# Altium PCB Copy before routing of BetaBake..PcbDoc (part 2 of 4)
Units mil, origin at the board's own origin, x right, y up, seen from the top; angles counter-clockwise.
Board outline 6000 x 4000 mil, 8 copper layers (Top Layer, GND Plein, Signal 2, PWR, GND Plein 2, Signal 3, GND Plein 3, Bottom Layer), stack 40.468 mil thick; 436 components, 343 nets, 1746 pads, 14 vias.
Unrouted connection lines stored in the file: 1158.
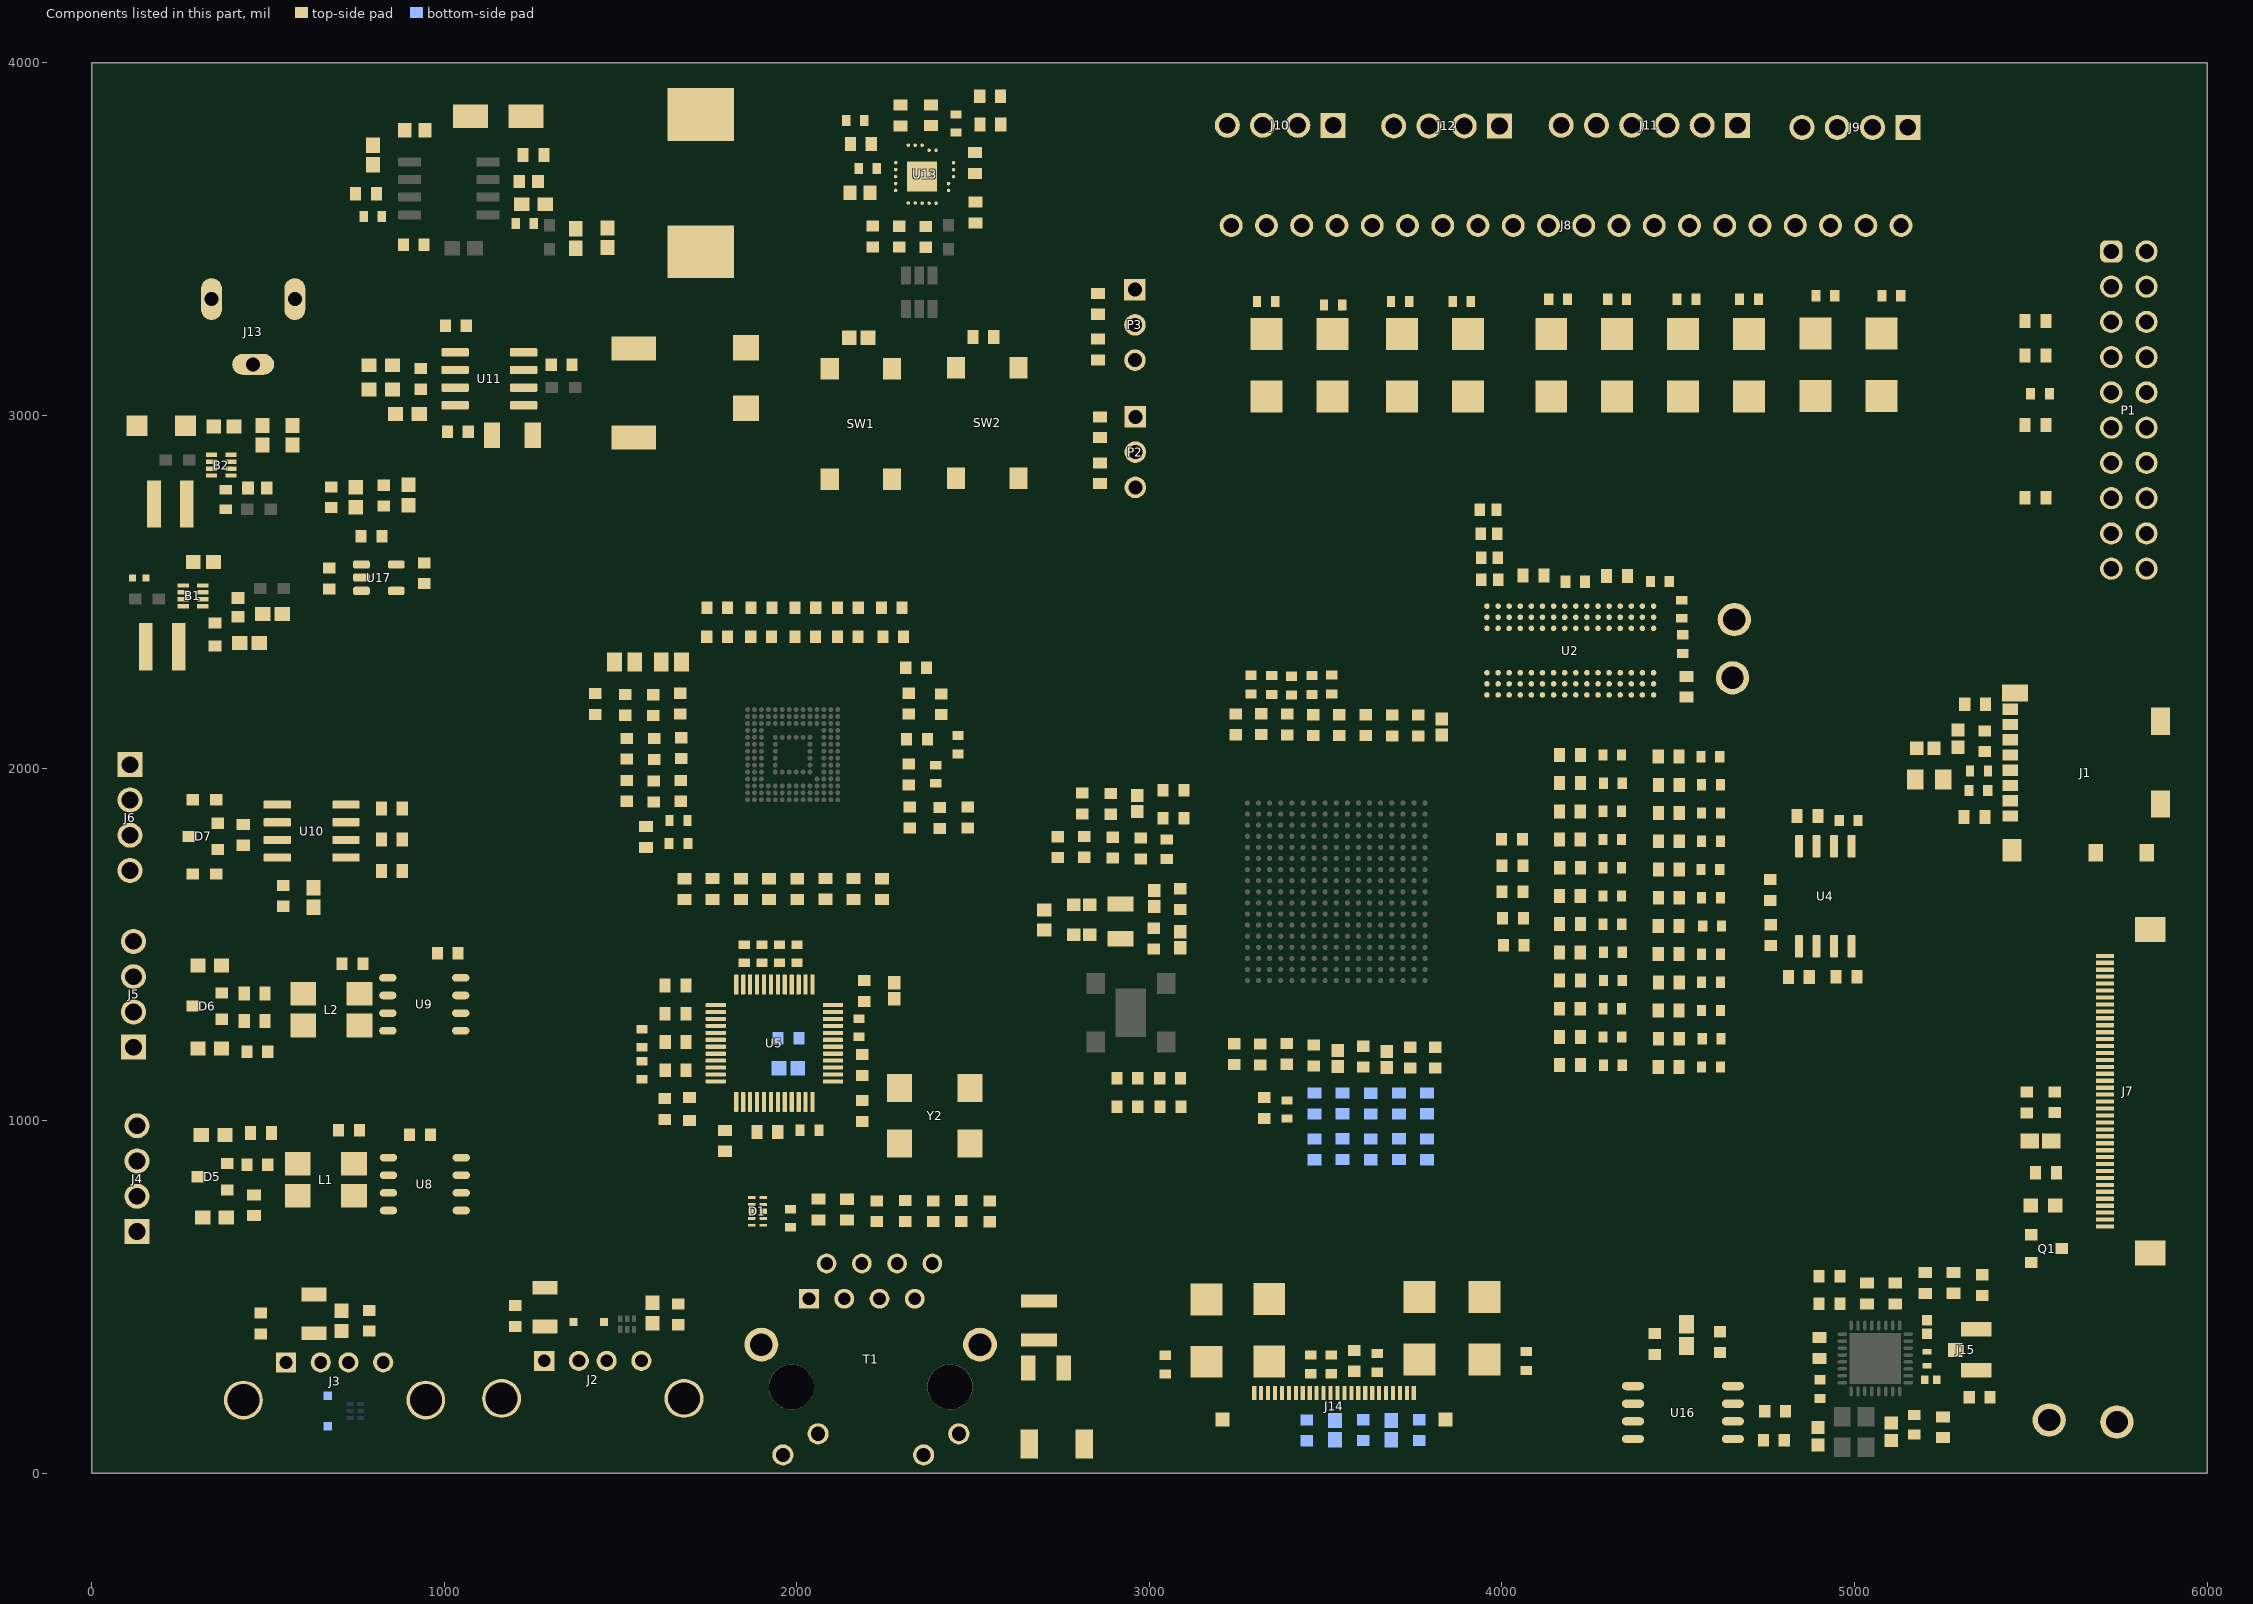
[diagram p4: the components of this part, seen from the top]

## Footprints (in the part's own frame and the unit in brackets; to place one, negate y for a bottom-side part, rotate by r counter-clockwise, add the part's x,y. Pads: shape width x height; smd on the part's side, far side on the other; paste and mask are expansions set on the pad) (continued)
FP-RGP0020A-MFG [mm]
  round 0.252 smd paste-1000 mask+0: 1(-1.9,1) 2(-1.9,0.5) 3(-2.26,0) 4(-2.26,-0.5) 5(-2.26,-1) 6(-1,-1.9) 7(-0.5,-1.9) 8(0,-2.26) 9(0.5,-2.26) 10(1,-2.26) 11(1.9,-1) 12(1.9,-0.5) 13(1.915,0) 14(1.915,0.5) 15(1.915,1) 16(1,1.9) 17(0.5,1.9) 18(0,1.915) 19(-0.5,1.915) 20(-1,1.915)
  rect 2.15x2.15 smd paste-1000 mask+0: 21(0,0)
  Top Layer region: -2.4,1.14 -1.54,1.14 -1.486,1.129 -1.441,1.099 -1.411,1.054 -1.4,1 -1.4,1 -1.411,0.946 -1.441,0.901 -1.486,0.871 -1.54,0.86 -1.54,0.86 -2.4,0.86
  Top Layer region: -2.4,0.64 -1.54,0.64 -1.486,0.629 -1.441,0.599 -1.411,0.554 -1.4,0.5 -1.4,0.5 -1.411,0.446 -1.441,0.401 -1.486,0.371 -1.54,0.36 -1.54,0.36 -2.4,0.36
  Top Layer region: -2.4,0.14 -1.54,0.14 -1.486,0.129 -1.441,0.099 -1.411,0.054 -1.4,0 -1.4,0 -1.411,-0.054 -1.441,-0.099 -1.486,-0.129 -1.54,-0.14 -1.54,-0.14 -2.4,-0.14
  Top Layer region: -2.4,-0.36 -1.54,-0.36 -1.486,-0.371 -1.441,-0.401 -1.411,-0.446 -1.4,-0.5 -1.4,-0.5 -1.411,-0.554 -1.441,-0.599 -1.486,-0.629 -1.54,-0.64 -1.54,-0.64 -2.4,-0.64
  Top Layer region: -2.4,-0.86 -1.54,-0.86 -1.486,-0.871 -1.441,-0.901 -1.411,-0.946 -1.4,-1 -1.4,-1 -1.411,-1.054 -1.441,-1.099 -1.486,-1.129 -1.54,-1.14 -1.54,-1.14 -2.4,-1.14
  Top Layer region: 2.4,0.86 1.54,0.86 1.486,0.871 1.441,0.901 1.411,0.946 1.4,1 1.4,1 1.411,1.054 1.441,1.099 1.486,1.129 1.54,1.14 1.54,1.14 2.4,1.14
  Top Layer region: -0.64,-2.4 -0.64,-1.54 -0.629,-1.486 -0.599,-1.441 -0.554,-1.411 -0.5,-1.4 -0.5,-1.4 -0.446,-1.411 -0.401,-1.441 -0.371,-1.486 -0.36,-1.54 -0.36,-1.54 -0.36,-2.4
  Top Layer region: -0.14,-2.4 -0.14,-1.54 -0.129,-1.486 -0.099,-1.441 -0.054,-1.411 0,-1.4 0,-1.4 0.054,-1.411 0.099,-1.441 0.129,-1.486 0.14,-1.54 0.14,-1.54 0.14,-2.4
  Top Layer region: 0.36,-2.4 0.36,-1.54 0.371,-1.486 0.401,-1.441 0.446,-1.411 0.5,-1.4 0.5,-1.4 0.554,-1.411 0.599,-1.441 0.629,-1.486 0.64,-1.54 0.64,-1.54 0.64,-2.4
  Top Layer region: 0.86,-2.4 0.86,-1.54 0.871,-1.486 0.901,-1.441 0.946,-1.411 1,-1.4 1,-1.4 1.054,-1.411 1.099,-1.441 1.129,-1.486 1.14,-1.54 1.14,-1.54 1.14,-2.4
  Top Layer region: 1.14,2.4 1.14,1.54 1.129,1.486 1.099,1.441 1.054,1.411 1,1.4 1,1.4 0.946,1.411 0.901,1.441 0.871,1.486 0.86,1.54 0.86,1.54 0.86,2.4
  Top Layer region: 0.64,2.4 0.64,1.54 0.629,1.486 0.599,1.441 0.554,1.411 0.5,1.4 0.5,1.4 0.446,1.411 0.401,1.441 0.371,1.486 0.36,1.54 0.36,1.54 0.36,2.4
  Top Layer region: 0.14,2.4 0.14,1.54 0.129,1.486 0.099,1.441 0.054,1.411 0,1.4 0,1.4 -0.054,1.411 -0.099,1.441 -0.129,1.486 -0.14,1.54 -0.14,1.54 -0.14,2.4
  Top Layer region: -0.36,2.4 -0.36,1.54 -0.371,1.486 -0.401,1.441 -0.446,1.411 -0.5,1.4 -0.5,1.4 -0.554,1.411 -0.599,1.441 -0.629,1.486 -0.64,1.54 -0.64,1.54 -0.64,2.4
  Top Layer region: -0.86,2.4 -0.86,1.54 -0.871,1.486 -0.901,1.441 -0.946,1.411 -1,1.4 -1,1.4 -1.054,1.411 -1.099,1.441 -1.129,1.486 -1.14,1.54 -1.14,1.54 -1.14,2.4
  Top Layer region: 2.4,-1.14 1.54,-1.14 1.486,-1.129 1.441,-1.099 1.411,-1.054 1.4,-1 1.4,-1 1.411,-0.946 1.441,-0.901 1.486,-0.871 1.54,-0.86 1.54,-0.86 2.4,-0.86
  Top Layer region: 2.4,-0.64 1.54,-0.64 1.486,-0.629 1.441,-0.599 1.411,-0.554 1.4,-0.5 1.4,-0.5 1.411,-0.446 1.441,-0.401 1.486,-0.371 1.54,-0.36 1.54,-0.36 2.4,-0.36
  Top Layer region: 2.4,-0.14 1.54,-0.14 1.486,-0.129 1.441,-0.099 1.411,-0.054 1.4,0 1.4,0 1.411,0.054 1.441,0.099 1.486,0.129 1.54,0.14 1.54,0.14 2.4,0.14
  Top Layer region: -1.14,-2.4 -1.14,-1.54 -1.129,-1.486 -1.099,-1.441 -1.054,-1.411 -1,-1.4 -1,-1.4 -0.946,-1.411 -0.901,-1.441 -0.871,-1.486 -0.86,-1.54 -0.86,-1.54 -0.86,-2.4
  Top Layer region: 2.4,0.36 1.54,0.36 1.486,0.371 1.441,0.401 1.411,0.446 1.4,0.5 1.4,0.5 1.411,0.554 1.441,0.599 1.486,0.629 1.54,0.64 1.54,0.64 2.4,0.64
  silkscreen extent -3.1,-2.07 2.07,2.07, body extent -2.5,-2.5 2.5,2.5, height 0.25
FP-RT0603-MFG [mm]
  rect 0.9x0.8 smd paste+0 mask+0: 1(-0.85,0) 2(0.85,0)
  silkscreen extent -0.85,-0.81 0.86,0.8, body extent -1.4,-0.55 1.4,0.55, height 0.25
FP-SMA-MFG [mm]
  rect 2.5x1.7 smd paste+0 mask+0: 1(-2,0) 2(2,0)
  silkscreen extent -3.92,-1.46 2.3,1.46, body extent -3.35,-1.56 3.35,1.56, height 0.25
FP-SMBJ-CA-MFG [mm]
  rect 1.27x2.1 smd paste+0 mask+0: 1(-1.98,0) 2(1.98,0)
  silkscreen extent -2.28,-1.97 2.28,1.97, body extent -2.7,-1.81 2.7,1.81, height 2.44
FP-SMC-MFG [mm]
  rect 1.72x3.2 smd paste+0 mask+0: 1(-3.205,0) 2(3.205,0)
  silkscreen extent -4.75,-3.11 3.55,3.11, body extent -4.17,-3.21 4.17,3.21, height 0.25
FP-SOD323-CA-MFG [mm]
  rect 0.6x0.6 smd paste-1000 mask+0: 1(-1.1,0) 2(1.1,0)
  silkscreen extent -0.43,-0.67 0.43,0.67, body extent -1.25,-0.63 1.25,0.63, height 1.1
FP-TW-IPC_C [mm]
  round 0.399 smd paste+0 mask+0: A1(-3.2,6) A2(-2.4,6) A3(-1.6,6) A7(1.6,6) A8(2.4,6) A9(3.2,6) B1(-3.2,5.2) B2(-2.4,5.2) B3(-1.6,5.2) B7(1.6,5.2) B8(2.4,5.2) B9(3.2,5.2) C1(-3.2,4.4) C2(-2.4,4.4) C3(-1.6,4.4) C7(1.6,4.4) C8(2.4,4.4) C9(3.2,4.4) D1(-3.2,3.6) D2(-2.4,3.6) D3(-1.6,3.6) D7(1.6,3.6) D8(2.4,3.6) D9(3.2,3.6) E1(-3.2,2.8) E2(-2.4,2.8) E3(-1.6,2.8) E7(1.6,2.8) E8(2.4,2.8) E9(3.2,2.8) F1(-3.2,2) F2(-2.4,2) F3(-1.6,2) F7(1.6,2) F8(2.4,2) F9(3.2,2) G1(-3.2,1.2) G2(-2.4,1.2) G3(-1.6,1.2) G7(1.6,1.2) G8(2.4,1.2) G9(3.2,1.2) H1(-3.2,0.4) H2(-2.4,0.4) H3(-1.6,0.4) H7(1.6,0.4) H8(2.4,0.4) H9(3.2,0.4) J1(-3.2,-0.4) J2(-2.4,-0.4) J3(-1.6,-0.4) J7(1.6,-0.4) J8(2.4,-0.4) J9(3.2,-0.4) K1(-3.2,-1.2) K2(-2.4,-1.2) K3(-1.6,-1.2) K7(1.6,-1.2) K8(2.4,-1.2) K9(3.2,-1.2) L1(-3.2,-2) L2(-2.4,-2) L3(-1.6,-2) L7(1.6,-2) L8(2.4,-2) L9(3.2,-2) M1(-3.2,-2.8) M2(-2.4,-2.8) M3(-1.6,-2.8) M7(1.6,-2.8) M8(2.4,-2.8) M9(3.2,-2.8) N1(-3.2,-3.6) N2(-2.4,-3.6) N3(-1.6,-3.6) N7(1.6,-3.6) N8(2.4,-3.6) N9(3.2,-3.6) P1(-3.2,-4.4) P2(-2.4,-4.4) P3(-1.6,-4.4) P7(1.6,-4.4) P8(2.4,-4.4) P9(3.2,-4.4) R1(-3.2,-5.2) R2(-2.4,-5.2) R3(-1.6,-5.2) R7(1.6,-5.2) R8(2.4,-5.2) R9(3.2,-5.2) T1(-3.2,-6) T2(-2.4,-6) T3(-1.6,-6) T7(1.6,-6) T8(2.4,-6) T9(3.2,-6)
  silkscreen extent -4.55,-7 4,7, body extent -4.1,-7.1 4.1,7.1, height 0.25
FP-XFL4015-MFG [mm]
  rect 0.98x3.4 smd paste+0 mask+0: 1(-1.185,0) 2(1.185,0)
  silkscreen extent -2.68,-2.15 2.15,2.15, body extent -2.25,-2.25 2.25,2.25, height 0.25
J00-00XXNL [mil]
  rect 56x56 hole 36: 1(175,-250)
  round 56 hole 36: 2(125,-350) 3(75,-250) 4(25,-350) 5(-25,-250) 6(-75,-350) 7(-125,-250) 8(-175,-350)
  round 60 hole 40: 9(249,193) 10(149,133) 11(-150,193) 12(-250,133)
  round 96 hole 64: S1(-310,-120) S2(310,-120)
  round 128 hole 128 unplated: ""(-225,0) ""(225,0)
  silkscreen extent -375,-425 375,425, body extent -395,-415 392,425, height 601
KEYSTONE_5277 [mm]
  round 2.4 hole 1.6: 1(0,0)
  silkscreen extent -1.59,-1.59 1.59,1.59, body extent -1.07,-1.85 2.09,1.33, height 3.17
MOLX-54548-2471 [mm] "FPC Connector, 24-Leads, Right Angle, Pitch 0.5 mm, Mated Height 1.2 mm, SMT"
  rect 0.3x1 smd: 1(-5.75,0.95) 2(-5.25,0.95) 3(-4.75,0.95) 4(-4.25,0.95) 5(-3.75,0.95) 6(-3.25,0.95) 7(-2.75,0.95) 8(-2.25,0.95) 9(-1.75,0.95) 10(-1.25,0.95) 11(-0.75,0.95) 12(-0.25,0.95) 13(0.25,0.95) 14(0.75,0.95) 15(1.25,0.95) 16(1.75,0.95) 17(2.25,0.95) 18(2.75,0.95) 19(3.25,0.95) 20(3.75,0.95) 21(4.25,0.95) 22(4.75,0.95) 23(5.25,0.95) 24(5.75,0.95)
  rect 1x1 smd: MP1(-8.025,-0.95) MP2(8.025,-0.95)
  Top Layer region: 8.85,-0.3 7.2,-0.3 7.2,-1.6 8.85,-1.6
  Top Layer region: -8.85,-0.3 -7.2,-0.3 -7.2,-1.6 -8.85,-1.6
  silkscreen extent -8.6,-3.85 8.6,2.13, body extent -8.6,-3.85 8.6,1.15, height 1.21
NXP-SOIC-8_L [mm] "SOIC, 8-Leads, Body 5x4mm, Pitch 1.27mm, IPC High Density"
  oval 1.25x0.55 smd: 1(-2.625,1.905) 2(-2.625,0.635) 3(-2.625,-0.635) 4(-2.625,-1.905) 5(2.625,-1.905) 6(2.625,-0.635) 7(2.625,0.635) 8(2.625,1.905)
  silkscreen extent -2.75,-2.5 1.6,2.85, body extent -3,-2.5 3,2.5, height 1.75
PT0048A_N [mm] "QFP, 48-Leads, Body 7x7mm, Pitch 0.5mm, IPC Medium Density"
  rrect33% 1.45x0.3 smd: 1(-4.225,2.75) 2(-4.225,2.25) 3(-4.225,1.75) 4(-4.225,1.25) 5(-4.225,0.75) 6(-4.225,0.25) 7(-4.225,-0.25) 8(-4.225,-0.75) 9(-4.225,-1.25) 10(-4.225,-1.75) 11(-4.225,-2.25) 12(-4.225,-2.75) 25(4.225,-2.75) 26(4.225,-2.25) 27(4.225,-1.75) 28(4.225,-1.25) 29(4.225,-0.75) 30(4.225,-0.25) 31(4.225,0.25) 32(4.225,0.75) 33(4.225,1.25) 34(4.225,1.75) 35(4.225,2.25) 36(4.225,2.75)
  rrect33% 0.3x1.45 smd: 13(-2.75,-4.225) 14(-2.25,-4.225) 15(-1.75,-4.225) 16(-1.25,-4.225) 17(-0.75,-4.225) 18(-0.25,-4.225) 19(0.25,-4.225) 20(0.75,-4.225) 21(1.25,-4.225) 22(1.75,-4.225) 23(2.25,-4.225) 24(2.75,-4.225) 37(2.75,4.225) 38(2.25,4.225) 39(1.75,4.225) 40(1.25,4.225) 41(0.75,4.225) 42(0.25,4.225) 43(-0.25,4.225) 44(-0.75,4.225) 45(-1.25,4.225) 46(-1.75,4.225) 47(-2.25,4.225) 48(-2.75,4.225)
  silkscreen extent -4.35,-3.1 3.1,3.58, body extent -4.51,-4.51 4.51,4.51, height 1.5
PTS645SM43SMTR92LFS_MFG [mm] "Recommended Land Pattern"
  rect 1.55x1.3 smd paste+0 mask+0: 1(-3.975,2.25) 2(3.975,2.25) 3(-3.975,-2.25) 4(3.975,-2.25)
  silkscreen extent -5.52,-3 3,3, body extent -4.5,-3 4.5,3, height 5.3
RESC0603(1608)_L [mm] "Chip Resistor, Body 1.6x0.8mm, IPC High Density"
  rect 0.7x0.9 smd: 1(-0.7,0) 2(0.7,0)
  silkscreen extent -0.05,-0.35 0.05,0.35, body extent -0.85,-0.47 0.85,0.47, height 0.6
RESC1607X60N [mm]
  rect 1.04x1.02 smd: 1(-0.735,0) 2(0.735,0)
  body extent -0.8,-0.4 0.8,0.4, height 0.55
RESC1608X55N#1 [mm]
  rect 0.79x0.93 smd paste+0 mask+0.102: 1(-0.82,0) 2(0.82,0)
  silkscreen extent -0.11,-0.45 0.11,0.45, body extent -0.8,-0.4 0.8,0.4, height 0.55
RESC1608X55N#2 [mm]
  rect 0.79x0.93 smd: 1(-0.82,0) 2(0.82,0)
  silkscreen extent -0.11,-0.45 0.11,0.45, body extent -0.8,-0.4 0.8,0.4, height 0.55
RESC1608X55X25LL10T15 [mm] "Chip Resistor, 2-Leads, Body 1.60x0.80mm, IPC High Density"
  rect 0.6x0.8 smd: 1(-0.65,0) 2(0.65,0)
  body extent -0.85,-0.45 0.85,0.45, height 0.55
RESC1608X55X25ML10T15 [mm] "Chip Resistor, 2-Leads, Body 1.60x0.80mm, IPC Low Density"
  rect 0.8x1 smd: 1(-0.75,0) 2(0.75,0)
  body extent -0.85,-0.45 0.85,0.45, height 0.55
RESC1608X55X25NL10T15 [mm] "Chip Resistor, 2-Leads, Body 1.60x0.80mm, IPC Medium Density"
  rect 0.7x0.9 smd: 1(-0.7,0) 2(0.7,0)
  body extent -0.85,-0.45 0.85,0.45, height 0.55
RESC2013X60X35ML10T20 [mm] "Chip Resistor, 2-Leads, Body 2.1x1.35mm, IPC Low Density"
  rect 1.2x1.45 smd: 1(-1,0) 2(1,0)
  silkscreen extent -0.1,-0.63 0.1,0.63, body extent -1.05,-0.68 1.05,0.67, height 0.6
SMTC-TSW-103-07-X-S [mm] ".025 SQ Post Terminal Strip Assembly, 1x3 Pins, Vertical, 2.54mm Pitch, Male"
  rect 1.55x1.55 hole 1.02: 1(0,0)
  round 1.55 hole 1.02: 2(2.54,0) 3(5.08,0)
  silkscreen extent -1.46,-1.27 6.54,1.27, body extent -1.27,-1.27 6.35,1.27, height 8.38
SOIC127P599X175-8N [mm]
  rrect25% 1.97x0.6 smd paste+0 mask+0.102: 1(-2.47,1.905) 2(-2.47,0.635) 3(-2.47,-0.635) 4(-2.47,-1.905) 5(2.47,-1.905) 6(2.47,-0.635) 7(2.47,0.635) 8(2.47,1.905)
  silkscreen extent -4.14,-2.52 1.95,2.52, body extent -3,-2.45 3,2.45, height 1.75
SOIC127P600X175-8N [mm]
  rrect25% 1.97x0.59 smd paste+0 mask+0.102: 1(-2.475,1.905) 2(-2.475,0.635) 3(-2.475,-0.635) 4(-2.475,-1.905) 5(2.475,-1.905) 6(2.475,-0.635) 7(2.475,0.635) 8(2.475,1.905)
  silkscreen extent -4.54,-2.52 2,2.59, body extent -3,-2.49 3,2.49, height 1.68
SOIC127P790X216-8N#1 [mm]
  rrect25% 1.61x0.58 smd: 1(-3.605,1.905) 2(-3.605,0.635) 3(-3.605,-0.635) 4(-3.605,-1.905) 5(3.605,-1.905) 6(3.605,-0.635) 7(3.605,0.635) 8(3.605,1.905)
  silkscreen extent -5.31,-2.64 2.64,2.64, body extent -3.95,-2.64 3.95,2.64, height 2.16
SOIC127P790X216-8N#2 [mm]
  oval 1.6x0.6 smd: 1(-3.6,-1.905) 2(-3.6,-0.635) 3(-3.6,0.635) 4(-3.6,1.905) 5(3.6,1.905) 6(3.6,0.635) 7(3.6,-0.635) 8(3.6,-1.905)
  silkscreen extent -3.82,-2.82 2.47,2.65, body extent -3.95,-2.64 3.95,2.64
SON50P150X200X100-8N [mm]
  rect 0.8x0.3 smd: 1(-0.7,0.75) 2(-0.7,0.25) 3(-0.7,-0.25) 4(-0.7,-0.75) 5(0.7,-0.75) 6(0.7,-0.25) 7(0.7,0.25) 8(0.7,0.75)
  silkscreen extent -1.22,1.28 -0.97,1.52
SOT23-3 [mm]
  rect 0.8x0.9 smd: 1(-0.95,-1) 2(0.95,-1) 3(0,1.1)
  silkscreen extent -1.4,-0.1 1.4,0.7, body extent -1.15,-1.45 1.15,1.45, height 1.1
SOT95P280X145-5N [mm]
  rrect50% 1.21x0.59 smd paste+0 mask+0.102: 1(-1.255,0.95) 2(-1.255,0) 3(-1.255,-0.95) 4(1.255,-0.95) 5(1.255,0.95)
  silkscreen extent -2.51,-1.45 0.8,1.45, body extent -1.4,-1.45 1.4,1.45, height 1.45
SPM10054T6R8MHZR [mm]
  rect 3.8x4.8 smd: 1(-4.95,0) 2(4.95,0)
  silkscreen extent -7.4,-5 5.35,5
TE-292303-1_V [mm] "THD, 4-Leads, Body 13.13x14mm, Pitch 2.5mm"
  rect 1.45x1.45 hole 0.92: 1(-3.5,1.144)
  round 1.45 hole 0.92: 2(-1,1.144) 3(1,1.144) 4(3.5,1.144)
  round 2.8 hole 2.3: 5(-6.57,-1.566) 6(6.57,-1.566)
  silkscreen extent -6.57,-11.85 6.57,3.25, body extent -8.12,-11.85 8.12,2.15, height 7.72
TE_282834-4 [mm]
  rect 1.8x1.8 / inner round 1.8 / far side rect 1.8x1.8 hole 1.2: 1(-3.81,0)
  round 1.8 hole 1.2: 2(-1.27,0) 3(1.27,0) 4(3.81,0)
  silkscreen extent -6.16,-3.25 5.31,3.25, body extent -5.31,-3.25 5.31,3.25, height 10
TE_282834-6 [mm]
  rect 1.8x1.8 / inner round 1.8 / far side rect 1.8x1.8 hole 1.2: 1(-6.35,0)
  round 1.8 hole 1.2: 2(-3.81,0) 3(-1.27,0) 4(1.27,0) 5(3.81,0) 6(6.35,0)
  silkscreen extent -8.7,-3.25 7.85,3.25, body extent -7.85,-3.25 7.85,3.25, height 10
TE_1909763-1 [mm]
  rect 1x1.05 smd: 1(0,-1.525)
  rect 1.05x2.2 smd: G1(-1.475,0) G2(1.475,0)
  silkscreen extent -0.6,1.3 0.6,1.3, body extent -1.5,0 1.5,1.23, height 1.55
WE-PD_6033R [mm] "SMT Shielded Power Inductor, 2-leads, body 5.9x6.2mm"
  rect 1.85x1.9 smd: 1(-2.175,0) 2(2.175,0)
  Top Layer keep-out region: -2.95,-3.1 -2.95,-1.15 -1.05,-1.15 -1.05,1.15 -2.95,1.15 -2.95,3.1 2.95,3.1 2.95,1.15 1.05,1.15 1.05,-1.15 2.95,-1.15 2.95,-3.1
  silkscreen extent -3.72,-3.25 3.1,3.25, body extent -2.95,-3.1 2.95,3.1, height 2.9
WE-TVSP_DO-214AA_Bidirectional [mm] "Power TVS Diode, 2-Leads. body 4.32x3.62mm"
  rect 2.3x2.3 smd: 1(-1272.25,-1270) 2(-1267.75,-1270)
  silkscreen extent -1272.28,-1271.97 -1267.72,-1268.03, body extent -1272.7,-1271.81 -1267.3,-1268.19, height 2.38
XTAL_ASV-50.000MHZ-EJ-T [mm]
  rect 2x1.8 smd: 1(-2,2.54) 2(-2,-2.54) 3(2,-2.54) 4(2,2.54)
  silkscreen extent -3.8,-3.5 2.54,3.5
XTAL_ECS-.327-6-34RR-TR [mm]
  rect 1.1x1.9 smd: 1(-1.25,0) 2(1.25,0)
  silkscreen extent -2.84,-0.75 0.44,0.75, body extent -1.6,-0.75 1.6,0.75, height 0.9

## Part data
B1 B2: "2.4V-5.5V input, 2A step-down converter With 1% Accuracy in 1.5x2mm QFN", Manufacturer_Name="Texas Instruments", Mouser Part Number=595-TPS62822DLCR, Datasheet Link=http://www.ti.com/lit/gpn/tps62822, Geometry.Height=1mm, Manufacturer_Part_Number=TPS62822DLCR, Mouser Price/Stock=https://www.mouser.co.uk/ProductDetail/Texas-Instruments/TPS62822DLCR?qs=55YtniHzbhCS2IKlL8URbA%3D%3D
C1 C5 C6 C7 C28 C29 C41 C42 C96: library part CMP-03422-001507-1, "CAP CER 10UF 10V X5R 0603", Case Code (Imperial)=0603, Case Code (Metric)=1608, Dielectric=X5R, Max Operating Temperature=85°C, Min Operating Temperature=-55°C, Package Quantity=4000, Resistor Type=Ceramic, Tolerance=10%, Voltage Rating=10V, Capacitance=10uF, Case/Package=0603, Depth=0.8mm, Halogen Free="Halogen Free", Lead Free="Lead Free", Length=0.063inch, Mount="Surface Mount", Packaging="Tape and Reel", RoHS Compliant=Yes, Termination=SMD/SMT, Thickness=0.035inch, Voltage Rating (DC)=10V, Weight=7.1E-05oz, Width=0.031inch
C2 C4 C8 C9 C10 C11 C12 C13 C14 C15 C16 C17 C19 C20 C21 C22 C23 C25 C26 C27 C30 C31 C33 C34 C35 C36 C38 C39 C43 C45 C50: library part CMP-03422-001373-1, "0.22µF 50V Ceramic Capacitor X7R 0603 (1608 Metric) 0.063\" L x 0.031\" W (1.60mm x 0.80mm)", Capacitance="220 nF", Manufacturer=YAGEO, Manufacturer Part Number=CC0603KRX7R9BB224, Package=CC0603-DA, Temperature="-55°C to +125°C", Temperature Characteristic=X7R, Temperature Coefficient=15%, Temperature Range High=+125°C, Temperature Range Low=-55°C, Tolerance=0.1, Voltage="50 V", Automotive=No, Category=Cap, ComponentLink2Description=Datasheet, ComponentLink2URL=http://www.yageo.com/documents/recent/UPY-GPHC_X7R_6.3V-to-50V_18.pdf, Device Class L1="Passive Components", Device Class L2=Capacitors, Device Class L3="Ceramic Capacitors", Digikey Description="0.22µF 50V Ceramic Capacitor X7R 0603 (1608 Metric) 0.063\" L x 0.031\" W (1.60mm x 0.80mm)", Footprint Url=http://www.yageo.com/exep/pages/download/literatures/UPY-C_GEN_24.pdf, Height=0.9mm, Lead Free=Yes, Material=Ceramic, Mouser Description="0603 50 V 0.22 uF ±10% Tolerance X7R Multilayer Ceramic Capacitor", Octopart=https://octopart.com/cc0603krx7r9bb224-yageo-30314039, RoHS=TRUE, Voltage Rating="50 V"
C3 C129 C144: library part CMP-2006-02375-5, "Chip Capacitor, 100 nF, +/- 10%, 50 V, -55 to 125 degC, 0603 (1608 Metric), RoHS, Tape and Reel", Manufacturer=Murata, Max Operating Temperature="125 degC", Min Operating Temperature="-55 degC", Package Quantity=4000, Voltage Rating="50 V", ComponentLink1Description="Manufacturer URL", ComponentLink1URL=http://www.murata.com/, ComponentLink2Description=Datasheet, ComponentLink2URL=http://psearch.en.murata.com/capacitor/product/GCM188R71H104KA57%23.pdf, DatasheetVersion=07/2016, Height="0.8 mm", Length="1.6 mm", Mount="Surface Mount", Mounting Technology="Surface Mount", PackageDescription="2-Pin Surface Mount Device, Body 1.6 x 0.8 mm", PackageReference=0603, Packaging="Tape and Reel", REACH SVHC="No SVHC", RoHSCompliant=true
C18 C24 C32: library part CMP-2000-06075-2, "CAP CER 22UF 6.3V X5R 0603", Case Code (Imperial)=0603, Case Code (Metric)=1608, Dielectric=X5R, Max Operating Temperature=85°C, Min Operating Temperature=-55°C, Package Quantity=4000, Resistor Type=Ceramic, Tolerance=20%, Voltage Rating=6.3V, Capacitance=22uF, Case/Package=0603, Depth=0.8mm, Halogen Free="Halogen Free", Lead Free="Lead Free", Length=0.063inch, Mount="Surface Mount", Packaging="Tape and Reel", RoHS Compliant=Yes, Termination=SMD/SMT, Thickness=0.035inch, Voltage Rating (DC)=6.3V, Weight=7.1E-05oz, Width=0.031inch
C37 C56 C58 C82 C149: library part CMP-2000-06074-2, "CAP CER 4.7UF 10V X5R 0603", Capacitance="4.7 uF", Manufacturer=YAGEO, Manufacturer Part Number=CC0603KRX5R6BB475, Package=CC0603-DA, Temperature="-55°C to +125°C", Temperature Characteristic=X5R, Temperature Coefficient=15%, Temperature Range High=+125°C, Temperature Range Low=-55°C, Tolerance=0.1, Voltage="10 V", Automotive=No, Category=Cap, ComponentLink2Description=Datasheet, ComponentLink2URL=http://www.yageo.com/documents/recent/UPY-GPHC_X7R_6.3V-to-50V_18.pdf, Device Class L1="Passive Components", Device Class L2=Capacitors, Device Class L3="Ceramic Capacitors", Digikey Description="CAP CER 4.7UF 10V X5R 0603", Footprint Url=http://www.yageo.com/exep/pages/download/literatures/UPY-C_GEN_24.pdf, Height=0.9mm, Lead Free=Yes, Material=Ceramic, Mouser Description="4.7µF Surface Mount, MLCC 0603 (1608 Metric) Package Ceramic Capacitors", Octopart=https://octopart.com/cc0603krx5r6bb475-yageo-9292507, RoHS=TRUE, Voltage Rating="10 V"
C40 C53 C54 C55 C57 C59 C63 C64 C65 C66 C67 C68 C69 C73 C74 C75 C76 C77 C78 C79 C81 C83 C87 C90 C92 C93 C94 C95 C97 C98 C99 C100 C102 C106 C108 C111 C113 C115 C116 C117 C126 C145 C147 C148 C150 C151 C154 C155 C159 C160 C164 C167 C168 C169 C170 C356: library part CMP-2100-03601-2, "CAP CER 0.1UF 50V X7R 0603", Manufacturer=YAGEO, Manufacturer Part Number=CC0603KRX7R9BB104, Package=CC0603-DA, Temperature="-55°C to +125°C", Temperature Characteristic=X7R, Temperature Coefficient=15%, Temperature Range High=+125°C, Temperature Range Low=-55°C, Tolerance=0.1, Voltage="50 V", Automotive=No, Capacitance="100 nF", Category=Cap, ComponentLink2Description=Datasheet, ComponentLink2URL=http://www.yageo.com/documents/recent/UPY-GPHC_X7R_6.3V-to-50V_18.pdf, Device Class L1="Passive Components", Device Class L2=Capacitors, Device Class L3="Ceramic Capacitors", Digikey Description="CAP CER 0.1UF 50V X7R 0603", Footprint Url=http://www.yageo.com/exep/pages/download/literatures/UPY-C_GEN_24.pdf, Height=0.9mm, Lead Free=Yes, Material=Ceramic, Mouser Description="Multilayer Ceramic Capacitor, CC Series, 0.1 - F, - 10%, X7R, 50 V, 0603 [1608 Metric]", Octopart=https://octopart.com/cc0603krx7r9bb104-yageo-42244635, RoHS=TRUE, Voltage Rating="50 V"
C44 C91: library part CMP-2100-03594-1, "Chip Capacitor, 100 pF, +/- 5%, 50 V, -55 to 125 degC, 0603 (1608 Metric), RoHS, Tape and Reel", Capacitance=100pF, Case Code (Imperial)=0603, Case Code (Metric)=1608, Dielectric=C0G, Insulation Resistance=100GR, Manufacturer=Yageo, Max Operating Temperature=125degC, Min Operating Temperature=-55degC, Package Description="2-Pin Surface Mount Device, Body 1.6 x 0.8 mm", Package Quantity=1, Temperature Coefficient=30ppm/degC, Tolerance=5%, Voltage=50V, Case/Package=0603, Composition=Ceramic, Datasheet URL=http://www.yageo.com/documents/recent/UPY-GP_NP0_16V-to-50V_14.pdf, Datasheet Version="Rev. 14, 07/2016", Depth=0.8mm, Height=0.8mm, Lead Free=LeadFree, Length=1.6mm, Manufacturer URL=http://www.yageo.com/, Mount=SurfaceMount, Number of Pins=2, Package Reference=0603, Packaging=TapeandReel, Radiation Hardening=No, REACH SVHC=Unknown, RoHSCompliant=True, Termination=SMD/SMT, Thickness=0.035inch, Voltage Rating=50V, Voltage Rating (DC)=50V, Width=0.8mm
C46 C47 C48 C49: library part CMP-1035-00158-3, "CAP CER 2.2PF 50V NP0 0603", Manufacturer=KEMET, Manufacturer Part Number=C0603C229C5GACTU, Package=C0603C-CF, Temperature="-55°C to +125°C", Temperature Characteristic=C0G, Temperature Coefficient=30ppm/°C, Temperature Range High=+125°C, Temperature Range Low=-55°C, Tolerance="0.25 pF", Voltage Rating="50 V", Automotive=Yes, Automotive Grade="Grade 1", Capacitance="2.2 pF", Category=Cap, ComponentLink2Description=Datasheet, ComponentLink2URL=https://api.kemet.com/component-edge/download/datasheet/C0603C100J5GACAUTO.pdf, Device Class L1="Passive Components", Device Class L2=Capacitors, Device Class L3="Ceramic Capacitors", Digikey Description="CAP CER 2.2PF 50V NP0 0603", Height=0.87mm, Lead Free=Yes, Material=Ceramic, Mouser Description="Multilayer Ceramic Capacitors MLCC - SMD/SMT 50volts 2.2pF C0G 0.25%", Octopart=https://octopart.com/c0603c229c5gactu-kemet-3874912, RoHS=TRUE
C51 C52: library part CMP-1659-00030-1, "Chip Capacitor, 18 pF, +/- 5%, 50 V, -55 to 125 degC, 0603 (1608 Metric), RoHS, Tape and Reel", Case Code (Imperial)=0603, Case Code (Metric)=1608, Max Operating Temperature="155 degC", Min Operating Temperature="-55 degC", Package Quantity=200, Power Rating="100 mW", Resistance="68.1 Ohm", Tolerance=1%, Voltage Rating="50 V", Case\Package=0603, ComponentLink1Description="Manufacturer URL", ComponentLink1URL=http://www.yageo.com/, ComponentLink2Description=Datasheet, ComponentLink2URL=http://www.yageo.com/NewPortal/yageodocoutput?fileName=/pdf/MLCC/UPY-GP_NP0_16V-to-50V_14.pdf, DatasheetVersion="Rev. 14, 07/2016", Height="0.45 mm", Length="1.6 mm", PackageDescription="2-Pin Surface Mount Device, Body 1.6 x 0.8 mm", PackageReference=0603, Packaging="Tape and Reel", Radiation Hardening=No, RoHSCompliant=true, Width="0.8 mm"
C60: library part CMP-2000-06073-2, "CAP CER 2.2UF 10V X5R 0603", Manufacturer=YAGEO, Manufacturer Part Number=CC0603KRX5R6BB225, Package=CC0603-DA, Temperature="-55°C to +125°C", Temperature Characteristic=X5R, Temperature Coefficient=15%, Temperature Range High=+125°C, Temperature Range Low=-55°C, Tolerance=0.1, Voltage="10 V", Automotive=No, Capacitance="2.2 uF", Category=Cap, ComponentLink2Description=Datasheet, ComponentLink2URL=http://www.yageo.com/documents/recent/UPY-GPHC_X7R_6.3V-to-50V_18.pdf, Device Class L1="Passive Components", Device Class L2=Capacitors, Device Class L3="Ceramic Capacitors", Digikey Description="CAP CER 2.2UF 10V X5R 0603", Footprint Url=http://www.yageo.com/exep/pages/download/literatures/UPY-C_GEN_24.pdf, Height=0.9mm, Lead Free=Yes, Material=Ceramic, Mouser Description="Multilayer Ceramic Capacitors MLCC - SMD/SMT 2.2uF 10V X5R 10%", Octopart=https://octopart.com/cc0603krx5r6bb225-yageo-8376528, RoHS=TRUE, Voltage Rating="10 V"
C61 C62 C70 C71 C72 C80: library part CMP-2000-06075-2, "CAP CER 22UF 6.3V X5R 0603", Capacitance=22uF, Case Code (Imperial)=0603, Case Code (Metric)=1608, Dielectric=X5R, Max Operating Temperature=85°C, Min Operating Temperature=-55°C, Package Quantity=4000, Resistor Type=Ceramic, Tolerance=20%, Voltage Rating=6.3V, Case/Package=0603, Depth=0.8mm, Halogen Free="Halogen Free", Lead Free="Lead Free", Length=0.063inch, Mount="Surface Mount", Packaging="Tape and Reel", RoHS Compliant=Yes, Termination=SMD/SMT, Thickness=0.035inch, Voltage Rating (DC)=6.3V, Weight=7.1E-05oz, Width=0.031inch
C88: library part CMP-03020-034683-2, "CAP CER 4700PF 2KV X7R 1210", Capacitance=4.7nF, Case Code (Imperial)=1210, Case Code (Metric)=3225, Dielectric=X7R, Dielectric Material=Ceramic, Max Operating Temperature=125°C, Min Operating Temperature=-55°C, Tolerance=10%, Voltage Rating=2kV, Case/Package=1210, Depth=2.5mm, Dissipation Factor=2.5%, Height=2.1mm, Length=3.2mm, Material=Ceramic, Mount="Surface Mount", NexarPartId=17605740, Packaging="Tape and Reel", REACH SVHC="No SVHC", RoHS=Compliant, Schedule B="8532240020, 8532240020", Termination=SMD/SMT, Thickness=2.3114mm, Voltage Rating (DC)=2kV, Width=2.5mm
C101 C103: library part CMP-03422-000162-1, "1UF 10V X5R 0603", Capacitance="1 uF", Manufacturer=YAGEO, Manufacturer Part Number=CC0603KRX5R6BB105, Package=CC0603-DA, Temperature="-55°C to +125°C", Temperature Characteristic=X5R, Temperature Coefficient=15%, Temperature Range High=+125°C, Temperature Range Low=-55°C, Tolerance=0.1, Voltage="10 V", Automotive=No, Category=Cap, ComponentLink2Description=Datasheet, ComponentLink2URL=http://www.yageo.com/documents/recent/UPY-GPHC_X7R_6.3V-to-50V_18.pdf, Device Class L1="Passive Components", Device Class L2=Capacitors, Device Class L3="Ceramic Capacitors", Digikey Description="CAP CER 1UF 10V X5R 0603", Footprint Url=http://www.yageo.com/exep/pages/download/literatures/UPY-C_GEN_24.pdf, Height=0.9mm, Lead Free=Yes, Material=Ceramic, Mouser Description="Multilayer Ceramic Capacitors MLCC - SMD/SMT 1.0uF 10V X5R 10%", Octopart=https://octopart.com/cc0603krx5r6bb105-yageo-8376527, RoHS=TRUE, Voltage Rating="10 V"
C104 C107 C109 C112 C135 C136 C140: library part CC0603JRNPO9BN470, "47 pF Â±5% 50V Ceramic Capacitor C0G, NP0 0603 (1608 Metric)", Package="0603 Yageo", Check_prices=https://www.snapeda.com/parts/CC0603JRNPO9BN470/Yageo/view-part/?ref=eda, MF=Yageo, MP=CC0603JRNPO9BN470, SnapEDA_Link=https://www.snapeda.com/parts/CC0603JRNPO9BN470/Yageo/view-part/?ref=snap
C105 C110: library part CMP-2100-03603-2, "CAP CER 4700PF 50V X7R 0603", Manufacturer=YAGEO, Manufacturer Part Number=CC0603KRX7R9BB472, Package=CC0603-DA, Temperature="-55°C to +125°C", Temperature Characteristic=X7R, Temperature Coefficient=15%, Temperature Range High=+125°C, Temperature Range Low=-55°C, Tolerance=0.1, Voltage="50 V", Automotive=No, Capacitance="4.7 nF", Category=Cap, ComponentLink2Description=Datasheet, ComponentLink2URL=http://www.yageo.com/documents/recent/UPY-GPHC_X7R_6.3V-to-50V_18.pdf, Device Class L1="Passive Components", Device Class L2=Capacitors, Device Class L3="Ceramic Capacitors", Digikey Description="CAP CER 4700PF 50V X7R 0603", Footprint Url=http://www.yageo.com/exep/pages/download/literatures/UPY-C_GEN_24.pdf, Height=0.9mm, Lead Free=Yes, Material=Ceramic, Mouser Description="Multilayer Ceramic Capacitors MLCC - SMD/SMT 4700PF 50V 10% 0603", Octopart=https://octopart.com/cc0603krx7r9bb472-yageo-192936, RoHS=TRUE, Voltage Rating="50 V"
C114 C122 C123 C124 C132 C133 C152 C153: library part CMP-06035-036920-1, "Chip Multilayer Ceramic Capacitors for General Purpose, 0603, 10uF, X7R, 15%, 20%, 10V", Case/Package=0603
C120 C121 C146: library part CMP-2100-03600-2, "CAP CER 10000PF 50V X7R 0603", Manufacturer=YAGEO, Manufacturer Part Number=CC0603KRX7R9BB103, Package=CC0603-DA, Temperature="-55°C to +125°C", Temperature Characteristic=X7R, Temperature Coefficient=15%, Temperature Range High=+125°C, Temperature Range Low=-55°C, Tolerance=0.1, Voltage="50 V", Automotive=No, Capacitance="10 nF", Category=Cap, ComponentLink2Description=Datasheet, ComponentLink2URL=http://www.yageo.com/documents/recent/UPY-GPHC_X7R_6.3V-to-50V_18.pdf, Device Class L1="Passive Components", Device Class L2=Capacitors, Device Class L3="Ceramic Capacitors", Digikey Description="CAP CER 10000PF 50V X7R 0603", Footprint Url=http://www.yageo.com/exep/pages/download/literatures/UPY-C_GEN_24.pdf, Height=0.9mm, Lead Free=Yes, Material=Ceramic, Mouser Description="Multilayer Ceramic Capacitor, CC Series, 0.01 - F, - 10%, X7R, 50 V, 0603 [1608 Metric]", Octopart=https://octopart.com/cc0603krx7r9bb103-yageo-192938, RoHS=TRUE, Voltage Rating="50 V"
C125 C137: library part CMP-2006-02605-1, Manufacturer=Murata, Part Number=GRM1885C1H121JA01D
C127 C138: library part CMP-14477-004372-2, "Multilayer Ceramic Capacitor 4.7uF 6.3V X7R 20% SMD 0603 T/R", Capacitance=4.7uF, Case Code (Imperial)=0603, Case Code (Metric)=1608, Max Operating Temperature=125°C, Min Operating Temperature=-55°C, Tolerance=20%, Voltage Rating=6.3V, Case/Package=0603, Mount="Surface Mount", Packaging="Cut Tape", RoHS Compliant=Yes
C128: library part C1206C226K8RACTU, "22 ÂµF Â±10% 10V Ceramic Capacitor X7R 1206 (3216 Metric)", Package="1206-2 KEMET", Check_prices=https://www.snapeda.com/parts/C1206C226K8RACTU/KEMET/view-part/?ref=eda, MF=KEMET, MP=C1206C226K8RACTU, SnapEDA_Link=https://www.snapeda.com/parts/C1206C226K8RACTU/KEMET/view-part/?ref=snap
C130 C131: library part CMP-2000-05444-2, "Chip Multilayer Ceramic Capacitors for General Purpose, 0603, 47uF, X5R, 15%, 20%, 6.3V", Case Code (Imperial)=0603, Case Code (Metric)=1608, Dielectric=X5R, Max Operating Temperature=85°C, Min Operating Temperature=-55°C, Tolerance=20%, Voltage Rating=6.3V, Capacitance=47uF, Case/Package=0603, Length=0.063inch, Mount="Surface Mount", Packaging="Tape and Reel", Thickness=0.039inch, Voltage Rating (DC)=6.3V, Width=0.031inch
C134 C139: library part CMP-2100-03600-2, "CAP CER 10000PF 50V X7R 0603", Capacitance="10 nF", Manufacturer=YAGEO, Manufacturer Part Number=CC0603KRX7R9BB103, Package=CC0603-DA, Temperature="-55°C to +125°C", Temperature Characteristic=X7R, Temperature Coefficient=15%, Temperature Range High=+125°C, Temperature Range Low=-55°C, Tolerance=0.1, Voltage="50 V", Automotive=No, Category=Cap, ComponentLink2Description=Datasheet, ComponentLink2URL=http://www.yageo.com/documents/recent/UPY-GPHC_X7R_6.3V-to-50V_18.pdf, Device Class L1="Passive Components", Device Class L2=Capacitors, Device Class L3="Ceramic Capacitors", Digikey Description="CAP CER 10000PF 50V X7R 0603", Footprint Url=http://www.yageo.com/exep/pages/download/literatures/UPY-C_GEN_24.pdf, Height=0.9mm, Lead Free=Yes, Material=Ceramic, Mouser Description="Multilayer Ceramic Capacitor, CC Series, 0.01 - F, - 10%, X7R, 50 V, 0603 [1608 Metric]", Octopart=https://octopart.com/cc0603krx7r9bb103-yageo-192938, RoHS=TRUE, Voltage Rating="50 V"
C141: library part CMP-2006-02891-1, Manufacturer=Murata, Part Number=GRM188R71H102KA01D
C142 C245: library part CMP-03422-000162-1, "CAP CER 1UF 10V X5R 0603", Manufacturer=YAGEO, Manufacturer Part Number=CC0603KRX5R6BB105, Package=CC0603-DA, Temperature="-55°C to +125°C", Temperature Characteristic=X5R, Temperature Coefficient=15%, Temperature Range High=+125°C, Temperature Range Low=-55°C, Tolerance=0.1, Voltage="10 V", Automotive=No, Capacitance="1 uF", Category=Cap, ComponentLink2Description=Datasheet, ComponentLink2URL=http://www.yageo.com/documents/recent/UPY-GPHC_X7R_6.3V-to-50V_18.pdf, Device Class L1="Passive Components", Device Class L2=Capacitors, Device Class L3="Ceramic Capacitors", Digikey Description="CAP CER 1UF 10V X5R 0603", Footprint Url=http://www.yageo.com/exep/pages/download/literatures/UPY-C_GEN_24.pdf, Height=0.9mm, Lead Free=Yes, Material=Ceramic, Mouser Description="Multilayer Ceramic Capacitors MLCC - SMD/SMT 1.0uF 10V X5R 10%", Octopart=https://octopart.com/cc0603krx5r6bb105-yageo-8376527, RoHS=TRUE, Voltage Rating="10 V"
C161: library part CMP-03422-000162-1, "CAP CER 1UF 10V X5R 0603", Capacitance="1 uF", Manufacturer=YAGEO, Manufacturer Part Number=CC0603KRX5R6BB105, Package=CC0603-DA, Temperature="-55°C to +125°C", Temperature Characteristic=X5R, Temperature Coefficient=15%, Temperature Range High=+125°C, Temperature Range Low=-55°C, Tolerance=0.1, Voltage="10 V", Automotive=No, Category=Cap, ComponentLink2Description=Datasheet, ComponentLink2URL=http://www.yageo.com/documents/recent/UPY-GPHC_X7R_6.3V-to-50V_18.pdf, Device Class L1="Passive Components", Device Class L2=Capacitors, Device Class L3="Ceramic Capacitors", Digikey Description="CAP CER 1UF 10V X5R 0603", Footprint Url=http://www.yageo.com/exep/pages/download/literatures/UPY-C_GEN_24.pdf, Height=0.9mm, Lead Free=Yes, Material=Ceramic, Mouser Description="Multilayer Ceramic Capacitors MLCC - SMD/SMT 1.0uF 10V X5R 10%", Octopart=https://octopart.com/cc0603krx5r6bb105-yageo-8376527, RoHS=TRUE, Voltage Rating="10 V"
C162: library part GRM1555C1H2R4WA01D, "SMD Capacitor C0G(EIA) with Capacitance: 2.4pF Tol. 0.05pF. Rated Voltage: 50Vdc", Package="1005-2 Murata", Check_prices=https://www.snapeda.com/parts/GRM1555C1H2R4WA01D/Murata/view-part/?ref=eda, MF=Murata, MP=GRM1555C1H2R4WA01D, SnapEDA_Link=https://www.snapeda.com/parts/GRM1555C1H2R4WA01D/Murata/view-part/?ref=snap
C163: library part CMP-1034-00237-2, Manufacturer=Murata, Part Number=GRM1555C1H3R0WA01D
C165 C166: library part CMP-1659-00026-1, "Chip Capacitor, 22 pF, +/- 5%, 50 V, -55 to 125 degC, 0603 (1608 Metric), RoHS, Tape and Reel", ComponentLink1Description="Manufacturer URL", ComponentLink1URL=http://www.yageo.com/, ComponentLink2Description=Datasheet, ComponentLink2URL=http://www.yageo.com/documents/recent/UPY-GP_NP0_16V-to-50V_8.pdf, DatasheetVersion="Rev. 8, 08/2011", PackageDescription="2-Pin Surface Mount Device, Body 1.6 x 0.8 mm", PackageReference=0603
D1: library part CMP-04989-000015-1, "TVS DIODE 3.6V 8.8V 10USON", Clamping Voltage=8.8V, Max Operating Temperature=125°C, Min Breakdown Voltage=5.5V, Min Operating Temperature=-40°C, Operating Supply Voltage=3.6V, Peak Pulse Current=5A, Peak Pulse Power=17W, Power Line Protection=No, Resistor Type=Zener, Interface=USB, Lead Free="Lead Free", Mount="Surface Mount", Number of Bidirectional Channels=4, Number of Channels=4, Number of Pins=10, Packaging="Cut Tape", REACH SVHC="No SVHC", Reverse Standoff Voltage=3.6V, RoHS Compliant=Yes
D2: library part CMP-07401-000032-1, "TVS DIODE 28VWM 45.4VC SMB", Breakdown Voltage=35.8V, Case/Package=DO-214AA, Clamping Voltage=45.4V, Leakage Current=5uA, Max Operating Temperature=150°C, Max Power Dissipation=600W, Max Surge Current=100A, Min Breakdown Voltage=31.1V, Min Operating Temperature=-55°C, Operating Supply Voltage=3.5V, Package Quantity=1, Peak Pulse Current=13.2A, Power Line Protection=No, Resistor Type=Zener, Reverse Standoff Voltage=28V, Test Current=1mA, Diode Type=ZENER, Direction=Bidirectional, Element Configuration=Single, ESD Protection=Yes, Height=2.42mm, Length=4.57mm, Max Breakdown Voltage=35.8V, Max Reverse Leakage Current=5uA, Mount="Surface Mount", Number of Bidirectional Channels=1, Number of Channels=1, Number of Elements=1, Number of Pins=2, Packaging="Tape and Reel", Peak Pulse Power=600W, Polarity=Bidirectional, Radiation Hardening=No, REACH SVHC="No SVHC", Reverse Breakdown Voltage=31.1V, RoHS Compliant=Yes, Series=SMBJ, Termination=SMD/SMT, Width=3.94mm
D3 D4: library part CMP-14432-000001-1, "TVS DIODE 5V 14V SOD323"
D5 D6 D7: "50V Clamp 3A (8/20Âµs) Ipp Tvs Diode Surface Mount SOT-323", Package="SOT-23-3 NXP Semiconductors", Check_prices=https://www.snapeda.com/parts/PESD1CAN/Nexperia/view-part/?ref=eda, MF="Nexperia USA", MP=PESD1CAN, SnapEDA_Link=https://www.snapeda.com/parts/PESD1CAN/Nexperia/view-part/?ref=snap
D8 D9 D10 D11 D12 D13 D14 D15 D16 D17 D22 D23 D24 D25: library part CMP-03913-71101643-2, "TVS diode [Würth Elektronik] 824521751 TVS diode", Breakdown Voltage=87.7V, Clamping Voltage=121V, Leakage Current=1µA, Max Operating Temperature=150°C, Min Operating Temperature=-65°C, Peak Pulse Current=5A, Peak Pulse Power=600W, Power Line Protection=No, Reverse Standoff Voltage=75V, Composition=Zener, Height=2.4mm, Length=4.32mm, Max Breakdown Voltage=87.7V, Min Breakdown Voltage=87.7V, Mount="Surface Mount", Number of Bidirectional Channels=1, Number of Pins=2, Packaging="Cut Tape", Polarity=Bidirectional, REACH SVHC=Unknown, RoHS=Compliant, Width=3.62mm
D18: library part CMP-02539-000066-1, "DIODE SCHOTTKY 40V 3A DO214AB", Average Rectified Current=3A, Case/Package=SMC, Forward Voltage=500mV, Max Operating Temperature=125°C, Max Repetitive Reverse Voltage (Vrrm)=40V, Max Reverse Current=500uA, Max Surge Current=100A, Min Operating Temperature=-55°C, Package Quantity=3500, Element Configuration=Single, Forward Current=3A, Max Reverse Leakage Current=500uA, Max Reverse Voltage (DC)=40V, Mount="Surface Mount", Number of Pins=2, Packaging="Tape and Reel", Peak Non-Repetitive Surge Current=100A, Radiation Hardening=No, RoHS Compliant=Yes, Series=-
D19: library part CMP-18399-000022-1, "LED RED DIFFUSED 0402 SMD", Case Code (Imperial)=0402, Case Code (Metric)=1005, Color=Red, Forward Current=20mA, Forward Voltage=1.9V, Lens Color=White, Max Operating Temperature=85°C, Max Power Dissipation=60mW, Min Operating Temperature=-40°C, Package Quantity=4000, Reverse Voltage=5V, Case/Package=0402, Contact Plating=Gold, Depth=0.5mm, Dominant Wavelength=626nm, Height=0.4mm, Illumination Color=Red, Lead Free="Lead Free", Length=1mm, Lens Style=Diffused, Lens Transparency=Diffused, Luminous Flux=155lm, Luminous Intensity=90mcd, Mount="Surface Mount", Number of Elements=1, Number of LEDs=1, Number of Pins=2, Packaging="Tape and Reel", Power Dissipation=60mW, Power Rating=60mW, Radiation Hardening=No, REACH SVHC="No SVHC", Test Current=20mA, Viewing Angle=130°, Wavelength=626nm, Width=0.5mm
D20: library part CMP-1667-00003-3, "DIODE SCHOTTKY 40V 3A SMA", Average Rectified Current=3A, Capacitance=250pF, Case/Package=SMA, Forward Voltage=500mV, Max Forward Surge Current (Ifsm)=80A, Max Operating Temperature=125°C, Max Repetitive Reverse Voltage (Vrrm)=40V, Max Reverse Current=500uA, Min Operating Temperature=-55°C, Package Quantity=5000, Contact Plating=Tin, Current=3A, Current Rating=3A, Element Configuration=Single, Forward Current=3A, Height=2.3mm, Lead Free="Lead Free", Length=4.6mm, Max Reverse Voltage (DC)=40V, Mount="Surface Mount", Number of Pins=2, Output Current=3A, Packaging="Tape and Reel", Peak Non-Repetitive Surge Current=80A, Polarity=Standard, Radiation Hardening=No, REACH SVHC="No SVHC", RoHS Compliant=Yes, Series=-, Termination=SMD/SMT, Voltage=40V, Voltage Rating (DC)=40V, Weight=0.002258oz, Width=2.92mm
D21: library part CMP-2000-05061-2, "LED GREEN DIFFUSED 1206 SMD", Colour=Green, Forward Current=20mA, Forward Voltage=2.2V, Manufacturer=Broadcom, Manufacturer Part Number=HSMG-C150, Max Junction Temp=+95°C, Power Dissipation=65mW, Reverse Voltage=5V, Temperature="-40°C to +85°C", Temperature Range High=+85°C, Temperature Range Low=-40°C, Automotive=No, Category=Diode, ComponentLink2Description=Datasheet, ComponentLink2URL=https://docs.broadcom.com/docs/AV02-0551EN, Device Class L1=Optoelectronics, Device Class L2=LEDs, Device Class L3=unset, Digikey Description="LED GREEN DIFFUSED 1206 SMD", Height=1.2mm, Ipc Land Pattern Name=DIOCP320160X55, Lead Free=Yes, Led Orientation="Top View", Luminous Intensity=15mcd, Mouser Description="LED Uni-Color Green 570nm 2-Pin Chip LED T/R", Octopart=https://octopart.com/hsmg-c150-broadcom-71131304, Package=HSMG-C150, Peak Emmision Wavelength=570nm, RoHS=TRUE, Viewing Angle=170°, Wavelength=572nm
F1 F2: library part CMP-08606-000073-1, "PTC RESET FUSE 6V 500MA 1206", Case Code (Imperial)=1206, Case Code (Metric)=3216, Current Rating=100A, Hold Current=500mA, Max Operating Temperature=85°C, Max Power Dissipation=600mW, Max Voltage Rating (DC)=6V, Min Operating Temperature=-40°C, Package Quantity=4000, Resistance=700mR, Trip Current=1A, Approvals=cULus, Case/Package=1206, Height=0.75mm, Lead Free="Lead Free", Length=3.4mm, Max Current Rating=100A, Operating Supply Voltage=6V, Packaging="Tape and Reel", Power Dissipation=600mW, REACH SVHC="No SVHC", RoHS Compliant=Yes, Series=1206L, Terminal Material=Copper, Termination=SMD/SMT, Time to Trip=0.1s, Voltage Rating=6V, Voltage Rating (DC)=6V, Width=1.8mm, Working Voltage=6V
FB1 FB2: library part CMP-0686-00653-3, "Chip Ferrite Bead, 0805, 2200Ω @ 100MHz, 0.6Ω, 25%, 200mA", Case Code (Imperial)=0805, Case Code (Metric)=2012, Current Rating=200mA, DC Resistance (DCR)=600mR, DC Resistance-Max=600MR, Frequency=100MHz, Max Operating Temperature=125°C, Min Operating Temperature=-55°C, Package Quantity=1, Tolerance=25%, Case/Package=0805, Core Material=Ferrite, Depth=1.25mm, Height=0.85mm, Impedance=2.2kR, Lead Free="Lead Free", Length=2mm, Material=Steel, Max Current Rating=200mA, Max DC Current=200mA, Number of Circuits=1, Number of Lines=1, Number of Pins=2, Packaging="Tape and Reel", REACH SVHC="No SVHC", Resistance=600mR, RoHS Compliant=Yes, Series=BLM21B, Shielding=Unshielded, Termination=SMD/SMT, Test Frequency=100MHz, Weight=0.000194oz, Width=1.25mm
FB4: library part CMP-0686-00557-7, "Chip Ferrite Bead, 0603, 120Ω @ 100MHz, 0.05Ω, 25%, 2A", Case Code (Imperial)=0603, Case Code (Metric)=1608, Current Rating=2A, DC Resistance (DCR)=50mR, Frequency=100MHz, Max Operating Temperature=125°C, Min Operating Temperature=-55°C, Package Quantity=1, Tolerance=25%, Case/Package=0603, Core Material=Ferrite, DC Current=2A, Depth=0.8mm, Height=0.8mm, Impedance=120R, Lead Free="Lead Free", Length=1.6mm, Material=Steel, Max Current Rating=2A, Max DC Current=2A, Number of Circuits=1, Number of Lines=1, Number of Pins=2, Packaging="Tape and Reel", Radiation Hardening=No, REACH SVHC="No SVHC", RoHS Compliant=Yes, Shielding=Unshielded, Termination=SMD/SMT, Test Frequency=100MHz, Width=0.8mm
FB6: library part CMP-0686-00368-3, "Chip Ferrite Bead, 0603, 1500Ω @ 100MHz, 0.5Ω, 25%, 500mA", Case Code (Imperial)=0603, Case Code (Metric)=1608, Current Rating=500mA, DC Resistance (DCR)=500mR, Max Operating Temperature=125°C, Min Operating Temperature=-55°C, Package Quantity=1, Test Frequency=100MHz, Tolerance=25%, Case/Package=0603, Core Material=Ferrite, DC Current=500mA, Depth=0.8mm, Height=0.8mm, Impedance=1.5kR, Lead Free="Lead Free", Length=1.6mm, Material=Ferrite, Max Current Rating=500mA, Max DC Current=500mA, Military Standard=Not, Number of Circuits=1, Number of Lines=1, Number of Pins=2, Packaging="Tape and Reel", Radiation Hardening=No, REACH SVHC="No SVHC", Termination=SMD/SMT, Width=0.8mm
GND SDCLK0_N SDCLK0_P WIFI_TOUT: library part 5277, "TEST POINT (BLUE) - COMPACT", Package=None, Check_prices=https://www.snapeda.com/parts/5277/Keystone/view-part/?ref=eda, MF="Keystone Electronics", MP=5277, SnapEDA_Link=https://www.snapeda.com/parts/5277/Keystone/view-part/?ref=snap
J1 J15 Y2: Package=None, Availability=Unavailable, Price=None
  J1: MF="{'manufacturer': u'Molex'}", MP=1040310811
  J15: MP=1909763-1
  Y2: MP=ASV-50.000MHZ-EJ-T
J2 J3: library part CMP-2000-05404-1, "1 Port Right Angle Through Hole Mount Female Type A USB Connector, 4 Position, -55 to 85 degC, RoHS, Tube", Manufacturer="TE Connectivity", Package Description="4-Pin Through Hole Device, Body 14 x 13.13 mm, Pitch 2.5 mm", Connector Mounting=PCB, Connector Type=USBA, Contact Material=Copper, Contact Plating=Gold, Contact Termination Type=Solder, Datasheet URL=http://www.farnell.com/cad/1653030.pdf, Datasheet Version=Feb-12, Gender=Receptacle, Manufacturer URL=http://www.te.com/, No. of Contacts=4, Package Reference=292303-1, SVHC=NoSVHC(16-Jun-2014)
J4 J5 J6 J9 J10 J12: library part 282834-4, "Conn; Term Blk; PCB; Wire Receptacle; 4; 2.54mm; 30-16AWG; Green; 10A;150V; M1.6", Package=None, Centerline_Pitch="2.54 mm[.1 in]", Check_prices=https://www.snapeda.com/parts/282834-4/TE+Connectivity+AMP+Connectors/view-part/?ref=eda, EU_RoHS_Compliance="Compliant with Exemptions", MF="TE Connectivity", MP=282834-4, Number_of_Positions=4, SnapEDA_Link=https://www.snapeda.com/parts/282834-4/TE+Connectivity+AMP+Connectors/view-part/?ref=snap
J7: library part CMP-2000-06267-2, "CONN FFC BOTTOM 40POS 0.50MM R/A", Color=Beige, Contact Resistance=50mR, Current Rating=500mA, Flammability Rating="UL94 V-0", Insulation Resistance=500MR, Max Current Rating=400mA, Max Operating Temperature=70°C, Max Voltage Rating (AC)=50V, Min Operating Temperature=-40°C, Package Quantity=2000, Actuator Material=Polyphenylene, Contact Location=Bottom, Contact Material=Bronze, Contact Plating=Gold, Depth=5.6mm, Gender=Female, Housing Color=Beige, Housing Material=Polyamide, Insulation Material=Nylon, Lead Free="Lead Free", Lead Pitch=0.5mm, Length=24.1mm, Mating Cycles=20, Mount="Surface Mount", Number of Contacts=40, Number of Positions=40, Number of Rows=1, Orientation="Right Angle", Packaging="Tape and Reel", Pitch=0.5mm, REACH SVHC="No SVHC", RoHS Compliant=Yes, Series=FH12, Termination=Solder, Voltage Rating=50V, Voltage Rating (AC)=50V, Width=24.1mm, Wire/Cable Type=Straight
J8: library part 6130XX11121_61302011121, "20 pins, 1 row, straight, gold plating", Package=None, Check_prices=https://www.snapeda.com/parts/61302011121/Wurth+Electronics/view-part/?ref=eda, MF="Wurth Elektronik", MP=61302011121, SnapEDA_Link=https://www.snapeda.com/parts/61302011121/Wurth+Electronics/view-part/?ref=snap
J11: library part 282834-6, "Conn; Term Blk; PCB; Wire Receptacle; 6; 2.54mm; 30-16AWG; Green; 10A;150V; M1.6", Package=None, Check_prices=https://www.snapeda.com/parts/282834-6/TE+Connectivity+AMP+Connectors/view-part/?ref=eda, EU_RoHS_Compliance="Compliant with Exemptions", MF="TE Connectivity", MP=282834-6, SnapEDA_Link=https://www.snapeda.com/parts/282834-6/TE+Connectivity+AMP+Connectors/view-part/?ref=snap
J13: "2.0 x 6.5 mm, 5.0 A, Horizontal, Through Hole, Tapered Pins, Dc Power Jack Connector", Package=None, Check_prices=https://www.snapeda.com/parts/PJ-102AH/Same+Sky/view-part/?ref=eda, MF="Same Sky", MP=PJ-102AH, SnapEDA_Link=https://www.snapeda.com/parts/PJ-102AH/Same+Sky/view-part/?ref=snap
J14: library part CMP-1241-00556-1, "0.5 mm Pitch Easy-On(TM) Type FPC Connector, 1.2 mm Mated Height, Right Angle, ZIF, SMT, Bottom Contact, 24 Circuits, -20 to 85 degC, ELV and RoHS Compliant, Tape and Reel", Current (Max per Contact)=0.5A, Manufacturer=Molex, Voltage (Max)=50V, Circuits (Loaded)=24, ComponentLink1Description="Manufacturer URL", ComponentLink1URL=http://www.molex.com/molex/index.jsp, ComponentLink2Description=Datasheet, ComponentLink2URL=http://www.molex.com/webdocs/datasheets/pdf/en-us/0545482471_FFC_FPC_CONNECTORS.pdf, ComponentLink3Description="Package Specification", ComponentLink3URL=http://www.molex.com/pdm_docs/sd/545482471_sd.pdf, Contact Position=Bottom, Durability (mating cycles max)=20, Entry Angle="90degrees Angle", Mated Height=1.20mm, Material - Metal="Phosphor Bronze", Material - Plating Mating=Gold, Material - Plating Termination=Tin, Mounting Technology="Surface Mount", Number of Rows=1, Orientation="Right Angle", PackageDescription="24-Lead FPC Connector, Pitch 0.5 mm", PackageReference=54548-2471, PackageVersion="Rev. N, 06/2008", Packing="Tape and Reel", PartNumber=54548-2471, PCB Locator=No, PCB Retention=Yes, Pitch - Mating Interface=0.50mm, Polarized to PCB=Yes, RoHS=TRUE, Stackable=No
L1 L2: library part CMP-10467-000006-1, "CMC 51UH 250MA 2LN SMD AEC-Q200", Case/Package=1812, DC Current=250mA, DC Resistance (DCR)=550mR, Inductance=51uH, Max Operating Temperature=125°C, Min Operating Temperature=-55°C, Package Quantity=2500, Test Frequency=50Hz, Tolerance=50%, Core Material=Ferrite, Depth=3.5mm, Height=3mm, Length=4.5mm, Max DC Current=250mA, Military Standard=Not, Packaging="Tape and Reel", RoHS Compliant=Yes, Series=B82789C0/S0, Shielding=Unshielded, Termination=SMD/SMT, Weight=0.000952oz, Width=3.2mm
L3 L6: library part CMP-11268-000114-1, "Surface Mount Power Inductor, XFL4015 Series, 470 nH, 20%, Shielded, 8360 ohm, 11.2 A", Case/Package=SMD/SMT, DC Resistance (DCR)=8.36mR, Inductance=470nH, Inductance Tolerance=20%, Max DC Current=11.2A, Max Operating Temperature=125°C, Min Operating Temperature=-40°C, Package Quantity=40, Saturation Current=3.5A, Self Resonant Frequency=89MHz, Test Frequency=100kHz, Core Material=Composite, Height=1.6mm, Lead Free="Contains Lead", Length=4.3mm, Mount="Surface Mount", Packaging="Tape and Reel", REACH SVHC="No SVHC", RMS Current (Irms)=11.2A, RoHS Compliant=Yes, Series=XFL4015, Shielding=Shielded, Termination=SMD/SMT, Tolerance=20%, Width=4.3mm
L4: library part CMP-0227-00287-3, "General Purpose Inductor, 4.7uH, 25%, 1 Element, Ferrite-Core, SMD, 2423", Ambient Temperature Range High=85°C, Ambient Temperature Range Low=-40°C, Case Code (Imperial)=0603, Case Code (Metric)=1608, Case/Package=Nonstandard, Current Rating=2.2A, DC Resistance (DCR)=60mΩ, Inductance=4.7µH, Inductance Tolerance=25%, Max Operating Temperature=125°C, RMS Current (Irms)=2.65A, Saturation Current=2.5A, Self Resonant Frequency=53MHz, Test Frequency=100kHz, Composition=Wirewound, Core Material=Ferrite, Height=3.3mm, Height - Seated (Max)=3.302mm, Length=5.9mm, Max DC Current=2.2A, Min Operating Temperature=-40°C, Mount="Surface Mount", Number of Pins=2, RoHS=Compliant, Shielding=Shielded, Termination=SMD/SMT, Tolerance=25%, Weight=4.535924g, Width=6.2mm